# Altium PCB ecc83-pp_v2.altium-saved.PcbDoc
Units mil, origin at the board's own origin, x right, y up, seen from the top; angles counter-clockwise.
Board outline 1900 x 1650 mil, 2 copper layers (Dessus, Dessous), stack 65.792 mil thick; 15 components, 13 nets, 34 pads, 0 vias.
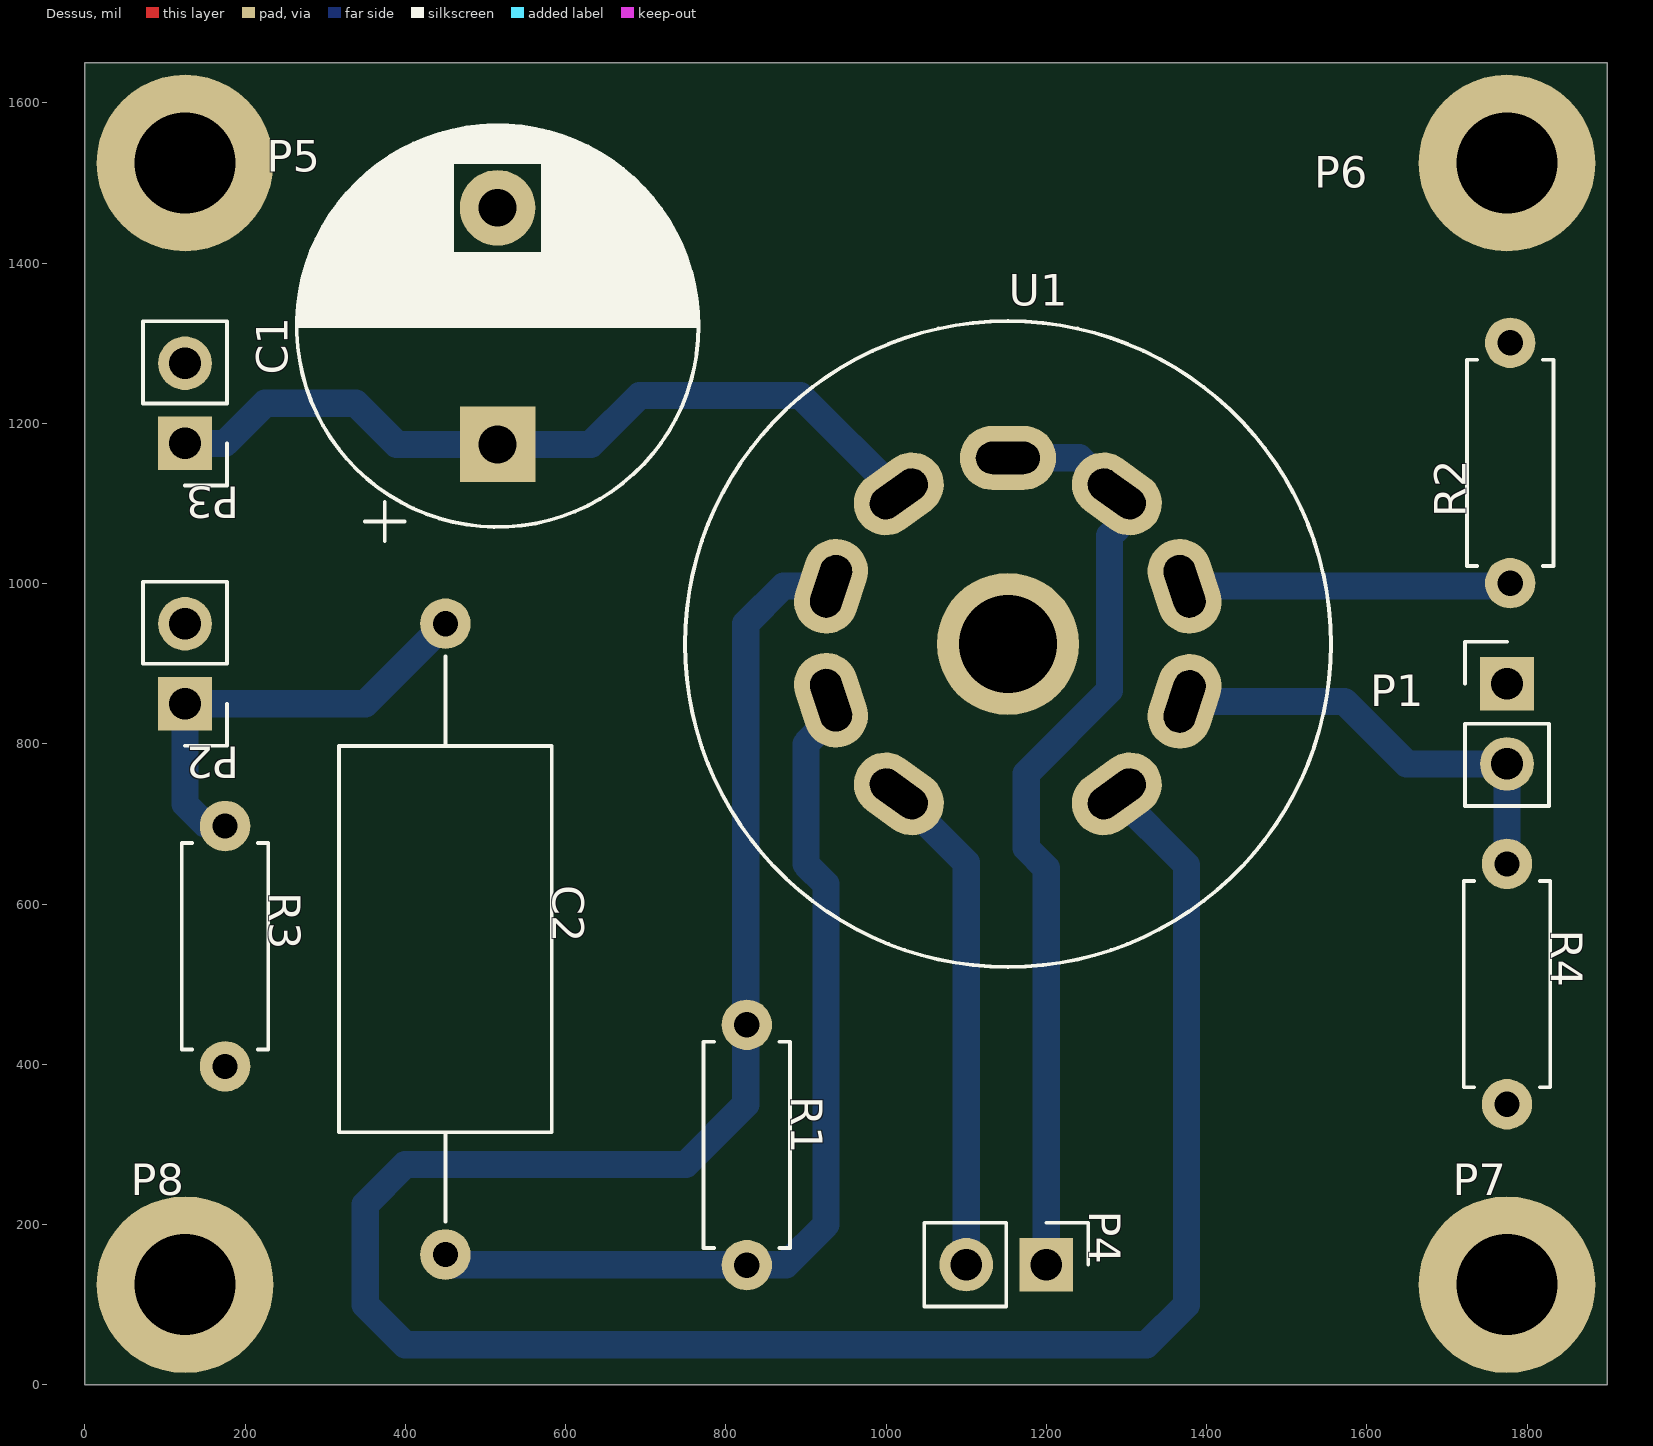
[diagram p0: Dessus view]
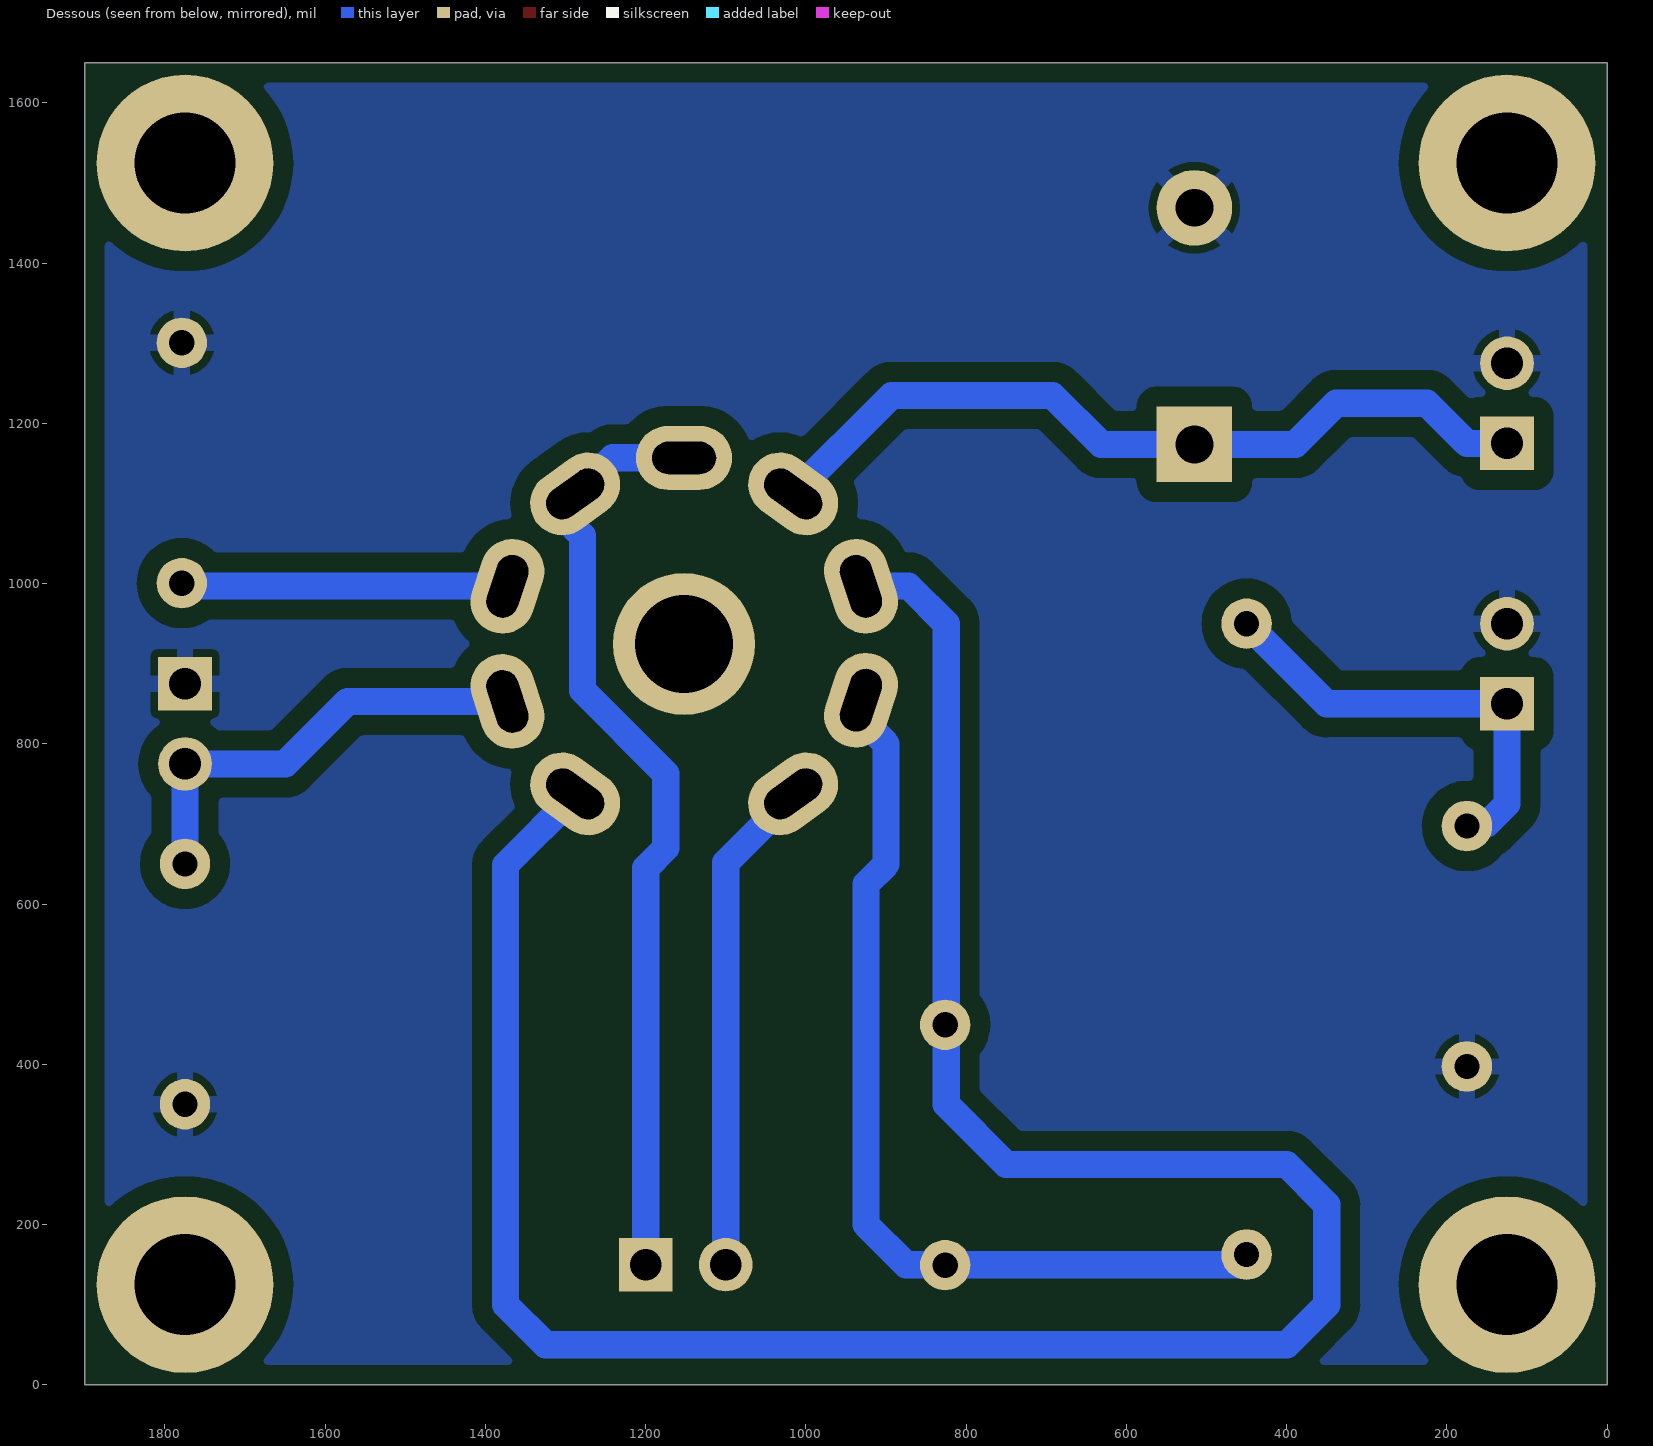
[diagram p1: Dessous view, seen from below]

## Layer stack, top to bottom
Top Solder: solder mask 0.4, Solder Resist, Dk 3.5
Dessus: signal copper 1.4
Dielectric 1: core 62.9921, FR-4, Dk 4.5
Dessous: signal copper 1.4
Bottom Solder: solder mask 0.4, Solder Resist, Dk 3.5

## Board outline
1900,0 0,0 0,1650 1900,1650

## Design rules (kind name [scope] priority, off if disabled: settings)
BoardOutlineClearance [All] p1: gap=0.39 ignorepadtopadclearanceinfootprint=FALSE
Clearance [All] p1: gap=20 ignorepadtopadclearanceinfootprint=FALSE
Clearance "Clearance_Polygon 0" [InNamedPolygon('Polygon 0')] p2: gap=25 ignorepadtopadclearanceinfootprint=FALSE
DiffPairsRouting [All] p1: maxlimit=9.84 minlimit=9.84 mostfreqgap=9.84 toplayer_minwidth=15 toplayer_maxwidth=15 toplayer_prefwidth=7.87 bottomlayer_minwidth=15 bottomlayer_maxwidth=15 bottomlayer_prefwidth=15 maxuncoupledlength=500
HoleSize [All] p1: absolutevalues=TRUE maxlimit=125.98 minlimit=11.81 maxpercent=80.000 minpercent=20.000
HoleToHoleClearance [All] p1: gap=9.84 allowstackedmicrovias=FALSE
MinimumAnnularRing [All] p1: minimumring=1.97
PolygonConnect "PolygonConnect_Polygon 0" [InNamedPolygon('Polygon 0')] p1: connectstyle=Relief reliefconductorwidth=19.7 reliefentries=4 polygonreliefangle="90 Angle" airgapwidth=10
PolygonConnect [All] p2: connectstyle=Relief reliefconductorwidth=19.68 reliefentries=4 polygonreliefangle="90 Angle" airgapwidth=19.68
RoutingVias [All] p1: holewidth=25 width=75 viastyle="Through Hole" minholewidth=11.81 minwidth=15.75 maxholewidth=25 maxwidth=75
SilkToSilkClearance [All] p1: silktosilkclearance=0
SolderMaskExpansion [All] p1: expansion=0 istentingtop=FALSE
Width [All] p1: maxlimit=34 minlimit=7.87 preferedwidth=34
26 further rules are at their usual default settings.

## Components (designator, comment, footprint, x,y, rotation, side; value= is the part's Value field where it differs from the comment)
C1 "10uF" CP_Radial_D12.5mm_P7.50mm 515.16,1173.82 r90 top
C2 "680nF" C_Axial_L12.0mm_D6.5mm_P20.00mm_Horizontal 450,950 r270 top
P1 "IN" PinHeader_1x02_P2.54mm_Vertical 1775,875 r0 top
P2 "OUT" PinHeader_1x02_P2.54mm_Vertical 125,850 r180 top
P3 "POWER" PinHeader_1x02_P2.54mm_Vertical 125,1175 r180 top
P4 "CONN_2" PinHeader_1x02_P2.54mm_Vertical 1200,150 r270 top
P5 "CONN_1" MountingHole_3.2mm_M3_DIN965_Pad 125,1525 r0 top
P6 "CONN_1" MountingHole_3.2mm_M3_DIN965_Pad 1775,1525 r0 top
P7 "CONN_1" MountingHole_3.2mm_M3_DIN965_Pad 1775,125 r0 top
P8 "CONN_1" MountingHole_3.2mm_M3_DIN965_Pad 125,125 r0 top
R1 "1.5K" R_Axial_DIN0207_L6.3mm_D2.5mm_P7.62mm_Horizontal 826.18,449.41 r270 top
R2 "1.5K" R_Axial_DIN0207_L6.3mm_D2.5mm_P7.62mm_Horizontal 1778.94,1000.59 r90 top
R3 "100K" R_Axial_DIN0207_L6.3mm_D2.5mm_P7.62mm_Horizontal 175,697.44 r270 top
R4 "47K" R_Axial_DIN0207_L6.3mm_D2.5mm_P7.62mm_Horizontal 1775,650.2 r270 top
U1 "ECC83" Valve_ECC-83-2 1152.17,924.61 r0 top

## Footprints (in the part's own frame and the unit in brackets; to place one, negate y for a bottom-side part, rotate by r counter-clockwise, add the part's x,y. Pads: shape width x height; smd on the part's side, far side on the other; paste and mask are expansions set on the pad)
C_Axial_L12.0mm_D6.5mm_P20.00mm_Horizontal [mm]
  round 1.6 hole 0.8: 1(0,0) 2(20,0)
  silkscreen extent 1.04,-3.37 18.96,3.37
CP_Radial_D12.5mm_P7.50mm [mm]
  rect 2.4x2.4 hole 1.2: 1(0,0)
  round 2.4 hole 1.2: 2(7.5,0)
  silkscreen extent -3.07,-6.37 10.12,6.37
MountingHole_3.2mm_M3_DIN965_Pad [mm]
  round 5.6 hole 3.2: 1(0,0)
PinHeader_1x02_P2.54mm_Vertical [mm]
  rect 1.7x1.7 hole 1: 1(0,0)
  round 1.7 hole 1: 2(0,-2.54)
  silkscreen extent -1.33,-3.87 1.33,1.33
R_Axial_DIN0207_L6.3mm_D2.5mm_P7.62mm_Horizontal [mm]
  round 1.6 hole 0.8: 1(0,0) 2(7.62,0)
  silkscreen extent 0.54,-1.37 7.08,1.37
Valve_ECC-83-2 [mm]
  oval 2.03x3.05 hole 1.02 slot 2.03 at 36 deg rot 126: 1(3.45,-4.75) 6(-3.46,4.76)
  oval 2.03x3.05 hole 1.02 slot 2.03 at 72 deg rot 162: 2(5.6,-1.82) 7(-5.61,1.83)
  oval 2.03x3.05 hole 1.02 slot 2.03 at 108 deg rot 18: 3(5.6,1.83) 8(-5.61,-1.78)
  oval 2.03x3.05 hole 1.02 slot 2.03 at 144 deg rot 54: 4(3.45,4.76) 9(-3.46,-4.75)
  oval 3.05x2.03 hole 1.02 slot 2.03 at 0 deg: 5(0,5.9)
  round 4.5 hole 3.1: ""(0,0)
  silkscreen extent -10.24,-10.24 10.24,10.24

## Nets (pads, with @x,y where several pads share a name; then routed paths per layer and width w, separated by ;. In a path a pad name is that pad's centre, name@x,y a point inside that pad or via, vN(x,y) a via of type N, cw(c..) or ccw(c..) an arc to the next point about the centre after c; other vN are vias at no path point)
GND: C1.2 P1.1 P2.2 P3.2 R2.2 R3.2 R4.2 | length 10
  Dessous w34: R4.2@1775,350 R4.2@1785,350
Net-(P1-PM): P1.2 R4.1 U1.2 | length 561.5
  Dessous w34: U1.2@1370.8,853 1572,853 1650,775 P1.2 R4.1@1775,650
Net-(P2-P1): C2.1 P2.1 R3.1 | length 551.8
  Dessous w34: R3.1@175,700 150,700 125,725 P2.1 350,850 C2.1
Net-(P3-P1): C1.1 P3.1 U1.6 | length 1009
  Dessous w34: P3.1 175,1175 225,1225 337.99,1225 389.17,1173.82 C1.1 631.3,1173.82 692.32,1234.84 893.11,1234.84 U1.6
Net-(P4-P1): P4.1 U1.4 U1.5 | length 1175.1
  Dessous w34: U1.5@1150,1157 1241.2,1157 U1.4@1286,1112.2 ; P4.1 1200,645 1175,670 1175,762.8 1278.94,866.73 1278.94,1059.65 1288.95,1069.66 U1.4@1288.95,1112.99
Net-(P4-PM): P4.2 U1.9 | length 623.4
  Dessous w34: U1.9@1014,737.8 1100,651.8 P4.2
Net-(U1A-G): R1.1 U1.1 U1.7 | length 3116.5
  Dessous w34: U1.7@929.2,997 872,997 825,950 825,450 825,350 750,275 400,275 350,225 350,100 400,50 1325,50 1375,100 1375,648.8 U1.1@1286,737.8
Net-(U1A-K): C2.2 R1.2 U1.8 | length 1172.8
  Dessous w34: C2.2@450,150 825,150 875,150 925,200 925,625 900,650 900,800 929.2,829.2 U1.8@929.2,854.6
Net-(U1B-K): R2.1 U1.3 | length 405.4
  Dessous w34: U1.3@1370.8,997 1772,997 R2.1@1775,1000
unconnected-(P5-Pad1): P5.1
unconnected-(P6-Pad1): P6.1
unconnected-(P7-Pad1): P7.1
unconnected-(P8-Pad1): P8.1
pads on no net: U1.

## Polygon pours and split planes (outlines as drawn)
GND on Dessous "Polygon 0" (solid, pour order 0): 1875,25 1875,1625 25,1625 25,25